# Altium PCB ISC-nRF52840-A-MODULE-Position-3.PcbDoc
Units mm, origin at the board's own origin, x right, y up, seen from the top; angles counter-clockwise.
Board outline 42.67 x 29.34 mm, 2 copper layers (Top Layer, Bottom Layer); 1 components, 0 nets, 55 pads, 0 vias.
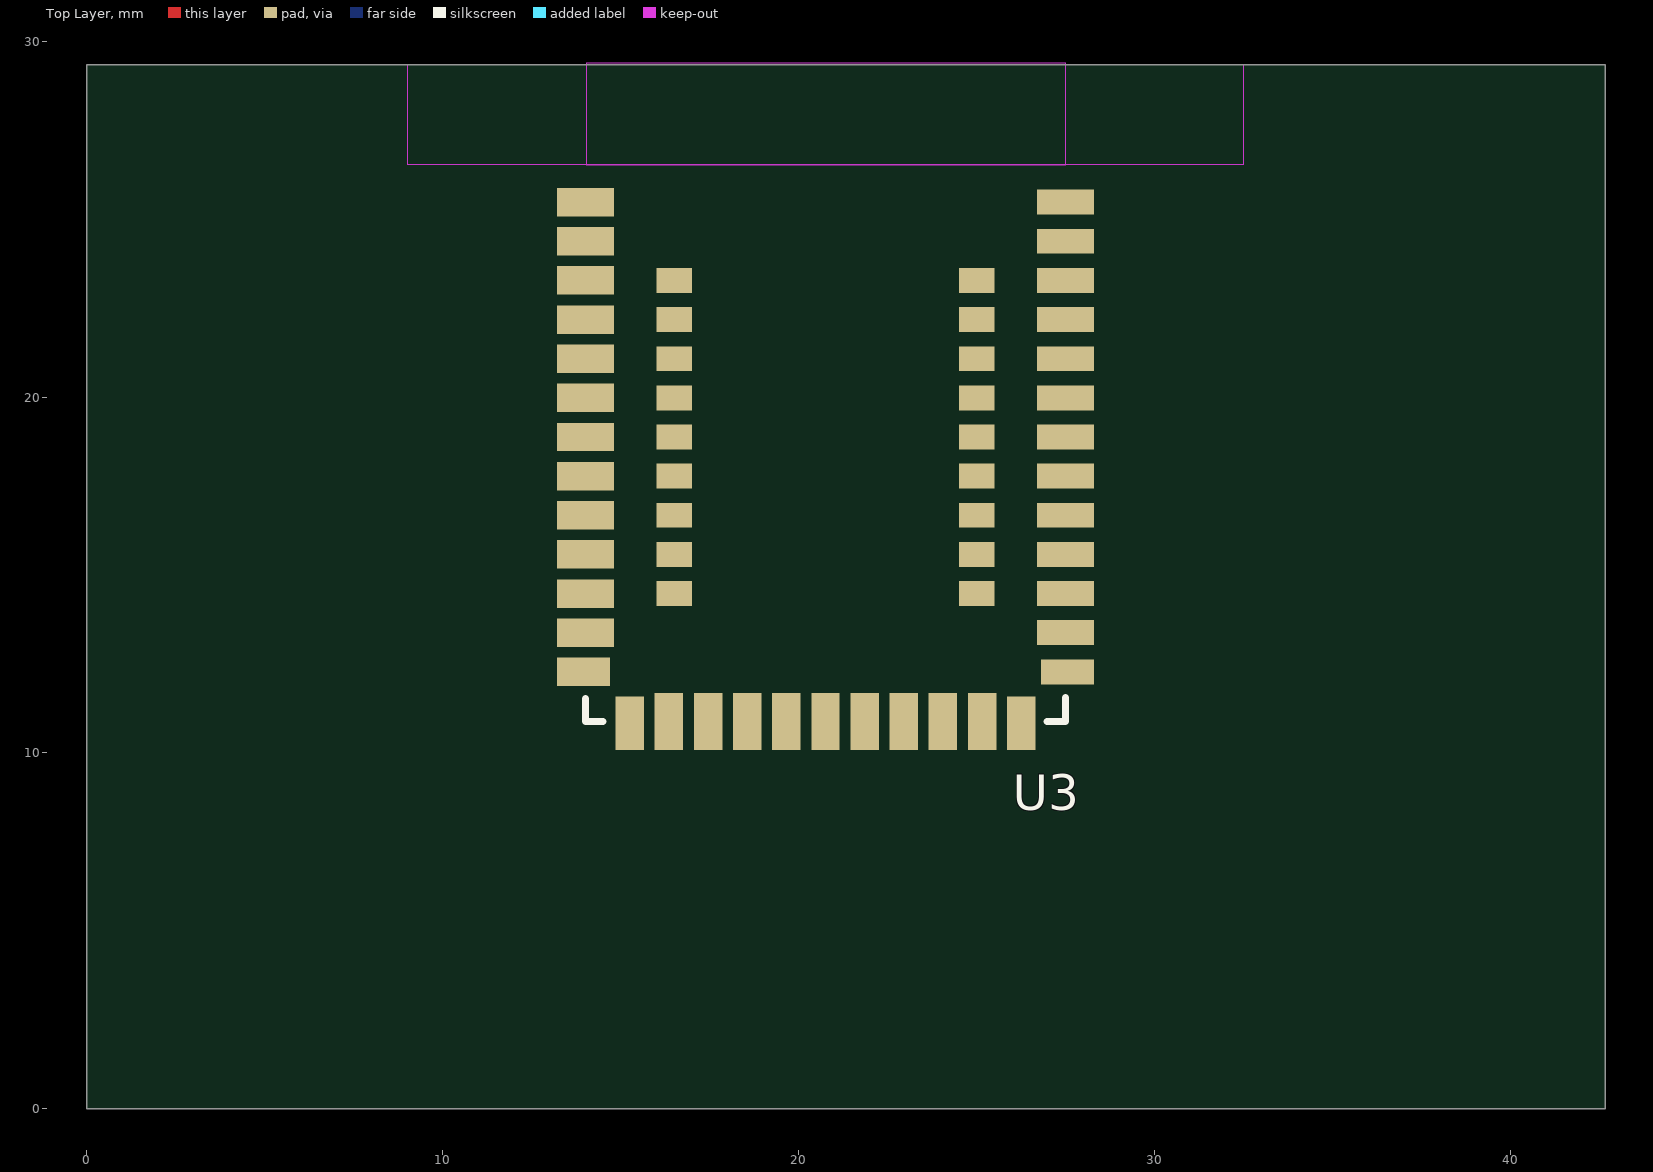
[diagram p0: Top Layer view]
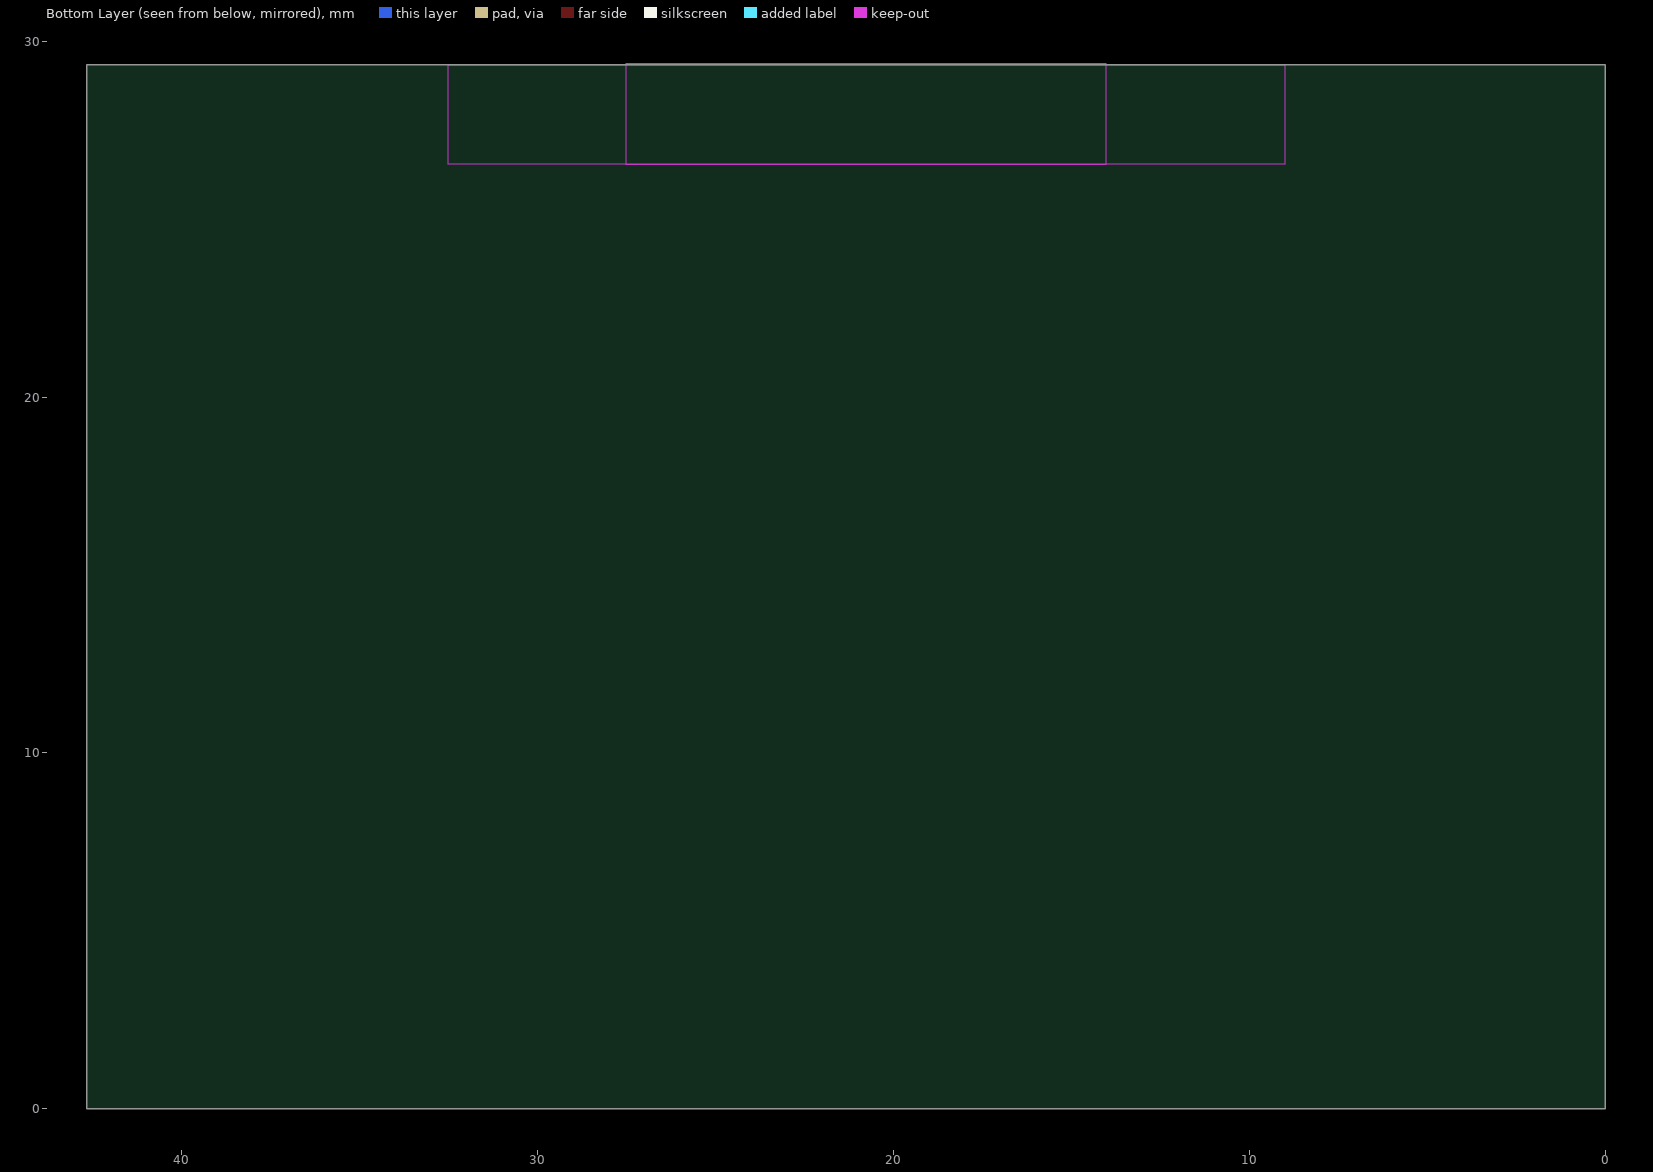
[diagram p1: Bottom Layer view, seen from below]

## Layer stack, top to bottom
Top Solder: solder mask 0.0102, Solder Resist, Dk 3.5
Top Layer: signal copper 0.0356
Dielectric 1: dielectric 0.32, FR-4, Dk 4.8
Bottom Layer: signal copper 0.0356
Bottom Solder: solder mask 0.0102, Solder Resist, Dk 3.5

## Board outline
0,0 0,29.337 42.672,29.337 42.672,0

## Design rules (kind name [scope] priority, off if disabled: settings)
Clearance [All] p1: gap=0.254 ignorepadtopadclearanceinfootprint=FALSE
PolygonConnect [All] p1: connectstyle=Relief reliefconductorwidth=0.254 reliefentries=4 polygonreliefangle="90 Angle" airgapwidth=0.254
RoutingVias [All] p1: holewidth=0.711 width=1.27 viastyle="Through Hole" minholewidth=0.711 minwidth=1.27 maxholewidth=0.711 maxwidth=1.27
SolderMaskExpansion [All] p1: expansion=0.102 istentingtop=FALSE
Width [All] p1: maxlimit=0.254 minlimit=0.254 preferedwidth=0.254
30 further rules are at their usual default settings.

## Components (designator, comment, footprint, x,y, rotation, side; value= is the part's Value field where it differs from the comment)
U3 "ISC-nRF52840-A" ISC-nRF52840-MODULE 20.76,18.153 r0 top (schematic designator U1)

## Footprints (in the part's own frame and the unit in brackets; to place one, negate y for a bottom-side part, rotate by r counter-clockwise, add the part's x,y. Pads: shape width x height; smd on the part's side, far side on the other; paste and mask are expansions set on the pad)
ISC-nRF52840-MODULE [mm]
  rect 1.6x0.8 smd mask+0.05: 1(-6.75,7.325) 2(-6.75,6.225) 3(-6.75,5.125) 4(-6.75,4.025) 5(-6.75,2.925) 6(-6.75,1.825) 7(-6.75,0.725) 8(-6.75,-0.375) 9(-6.75,-1.475) 10(-6.75,-2.575) 11(-6.75,-3.675) 12(-6.75,-4.775)
  rect 1.5x0.8 smd mask+0.05: 13(-6.8,-5.875)
  rect 0.8x1.5 smd mask+0.05: 14(-5.5,-7.325) 24(5.5,-7.325)
  rect 0.8x1.6 smd mask+0.05: 15(-4.4,-7.275) 16(-3.3,-7.275) 17(-2.2,-7.275) 18(-1.1,-7.275) 19(0,-7.275) 20(1.1,-7.275) 21(2.2,-7.275) 22(3.3,-7.275) 23(4.4,-7.275)
  rect 1.5x0.7 smd mask+0.05: 25(6.8,-5.875)
  rect 1.6x0.7 smd mask+0.05: 26(6.75,-4.775) 27(6.75,-3.675) 28(6.75,-2.575) 29(6.75,-1.475) 30(6.75,-0.375) 31(6.75,0.725) 32(6.75,1.825) 33(6.75,2.925) 34(6.75,4.025) 35(6.75,5.125) 36(6.75,6.225) 37(6.75,7.325)
  rect 1x0.7 smd mask+0.05: 38(-4.25,5.125) 39(-4.25,4.025) 40(-4.25,2.925) 41(-4.25,1.825) 42(-4.25,0.725) 43(-4.25,-0.375) 44(-4.25,-1.475) 45(-4.25,-2.575) 46(-4.25,-3.675) 47(4.25,5.125) 48(4.25,4.025) 49(4.25,2.925) 50(4.25,1.825) 51(4.25,0.725) 52(4.25,-0.375) 53(4.25,-1.475) 54(4.25,-2.575) 55(4.25,-3.675)
  Keep-Out Layer region: -6.731,8.382 6.759,8.382 6.759,11.235 -6.731,11.235
  silkscreen extent -6.75,-7.27 6.75,-6.6, body extent -6.75,-7.38 6.75,11.12

## Part data
U3: library part ISC-nRF52840-A-MODULE

## Nets (pads, with @x,y where several pads share a name; then routed paths per layer and width w, separated by ;. In a path a pad name is that pad's centre, name@x,y a point inside that pad or via, vN(x,y) a via of type N, cw(c..) or ccw(c..) an arc to the next point about the centre after c; other vN are vias at no path point)
pads on no net: U3.1 U3.2 U3.3 U3.4 U3.5 U3.6 U3.7 U3.8 U3.9 U3.10 U3.11 U3.12 U3.13 U3.14 U3.15 U3.16 U3.17 U3.18 U3.19 U3.20 U3.21 U3.22 U3.23 U3.24 U3.25 U3.26 U3.27 U3.28 U3.29 U3.30 U3.31 U3.32 U3.33 U3.34 U3.35 U3.36 U3.37 U3.38 U3.39 U3.40 U3.41 U3.42 U3.43 U3.44 U3.45 U3.46 U3.47 U3.48 U3.49 U3.50 U3.51 U3.52 U3.53 U3.54 U3.55

## Keep-outs
Keep-Out Layer:
  rectangle: 9.01,26.543 32.51,29.337

## Other copper
Top Layer:
  text "NOTE: Antenna performance decreases if the position increases (e.g., position 1 gives higher performance)." at 0.192,-3.526 h2

## Silkscreen, mask and mechanical layers (free items; w line width, h text height)
Mechanical 1:
  the board outline again, w0.2
  text "↑Option 3. Placing at the edge with no copper trace below the antenna" at -0.03,-1.462 h1.52

## Text inside footprints (layer, text, board x,y; h text height)
U3: Mechanical 4 "ANTENNA" at 17.483,27.424 h1.4